# Altium PCB DEMO-BOARD.PcbDoc
Units mil, origin at the board's own origin, x right, y up, seen from the top; angles counter-clockwise.
Board outline 1995 x 1440 mil, 2 copper layers (Top Layer, Bottom Layer); 13 components, 12 nets, 55 pads, 7 vias.
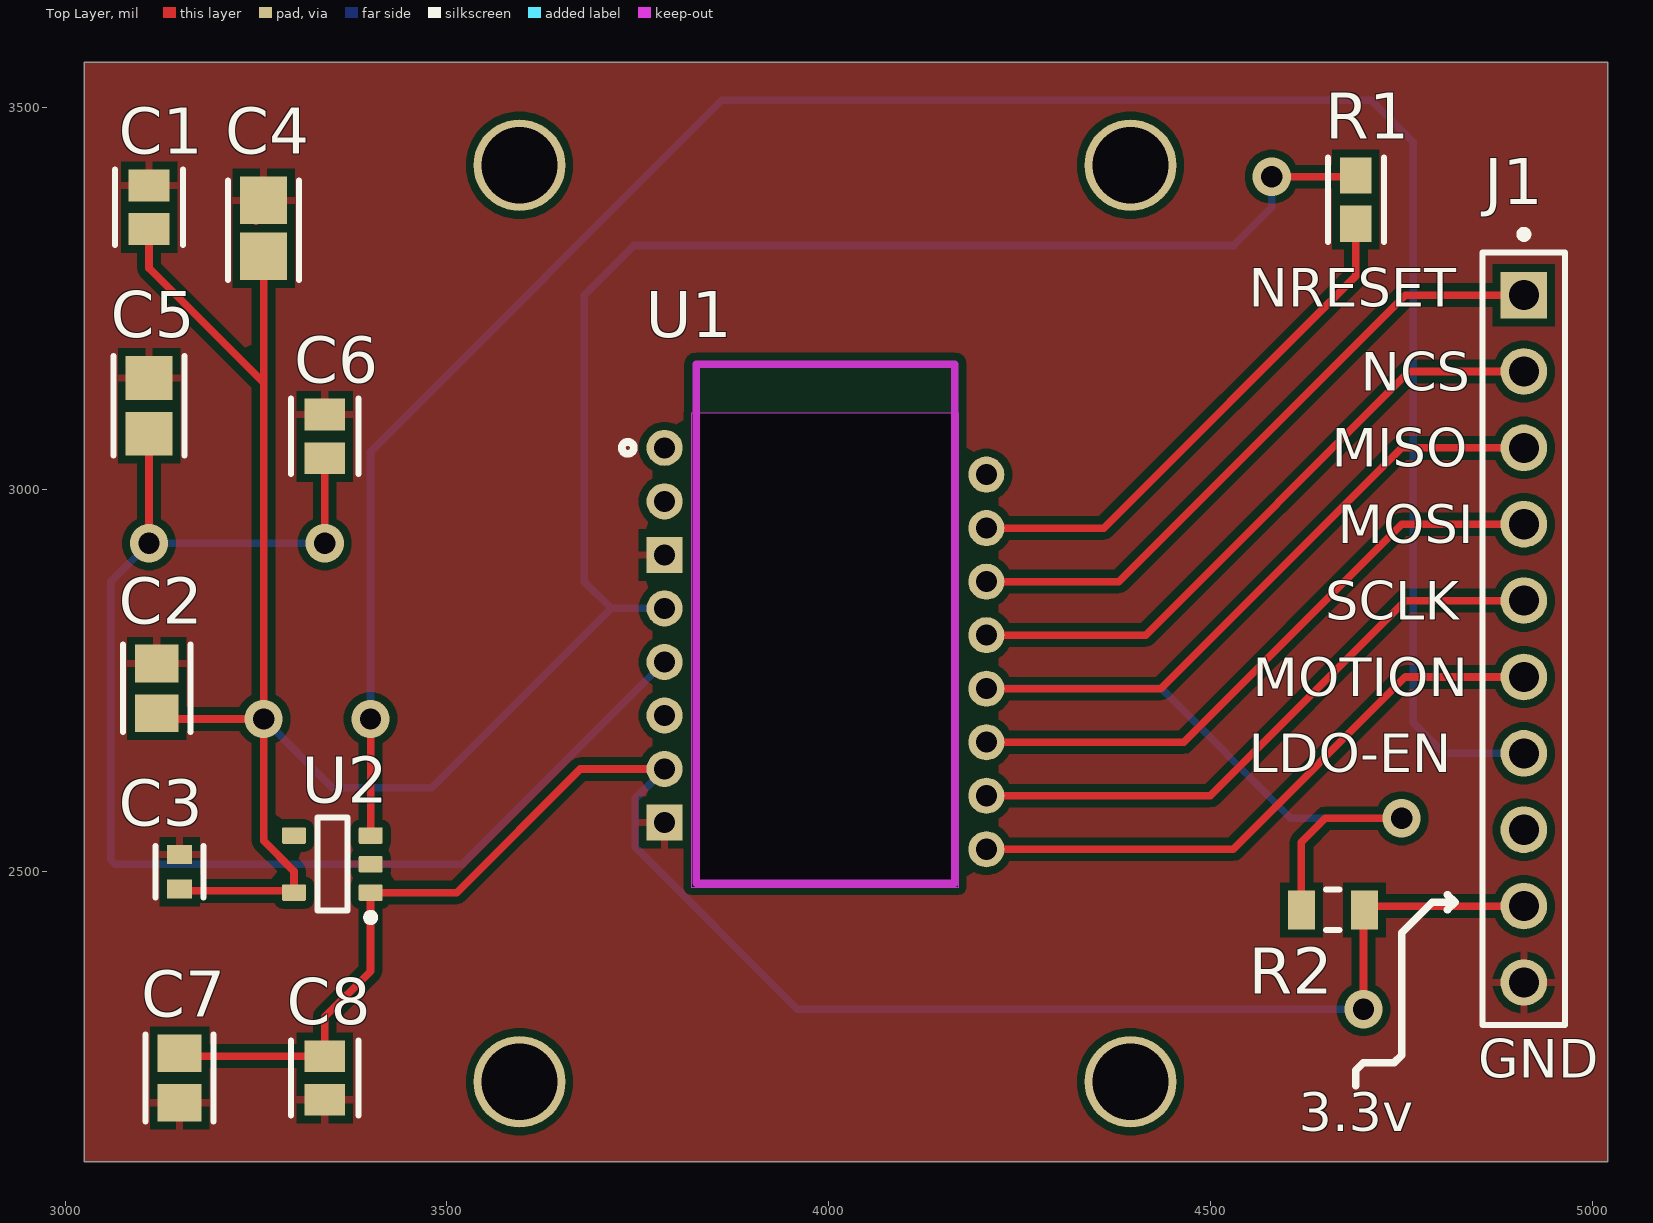
[diagram p0: Top Layer view]
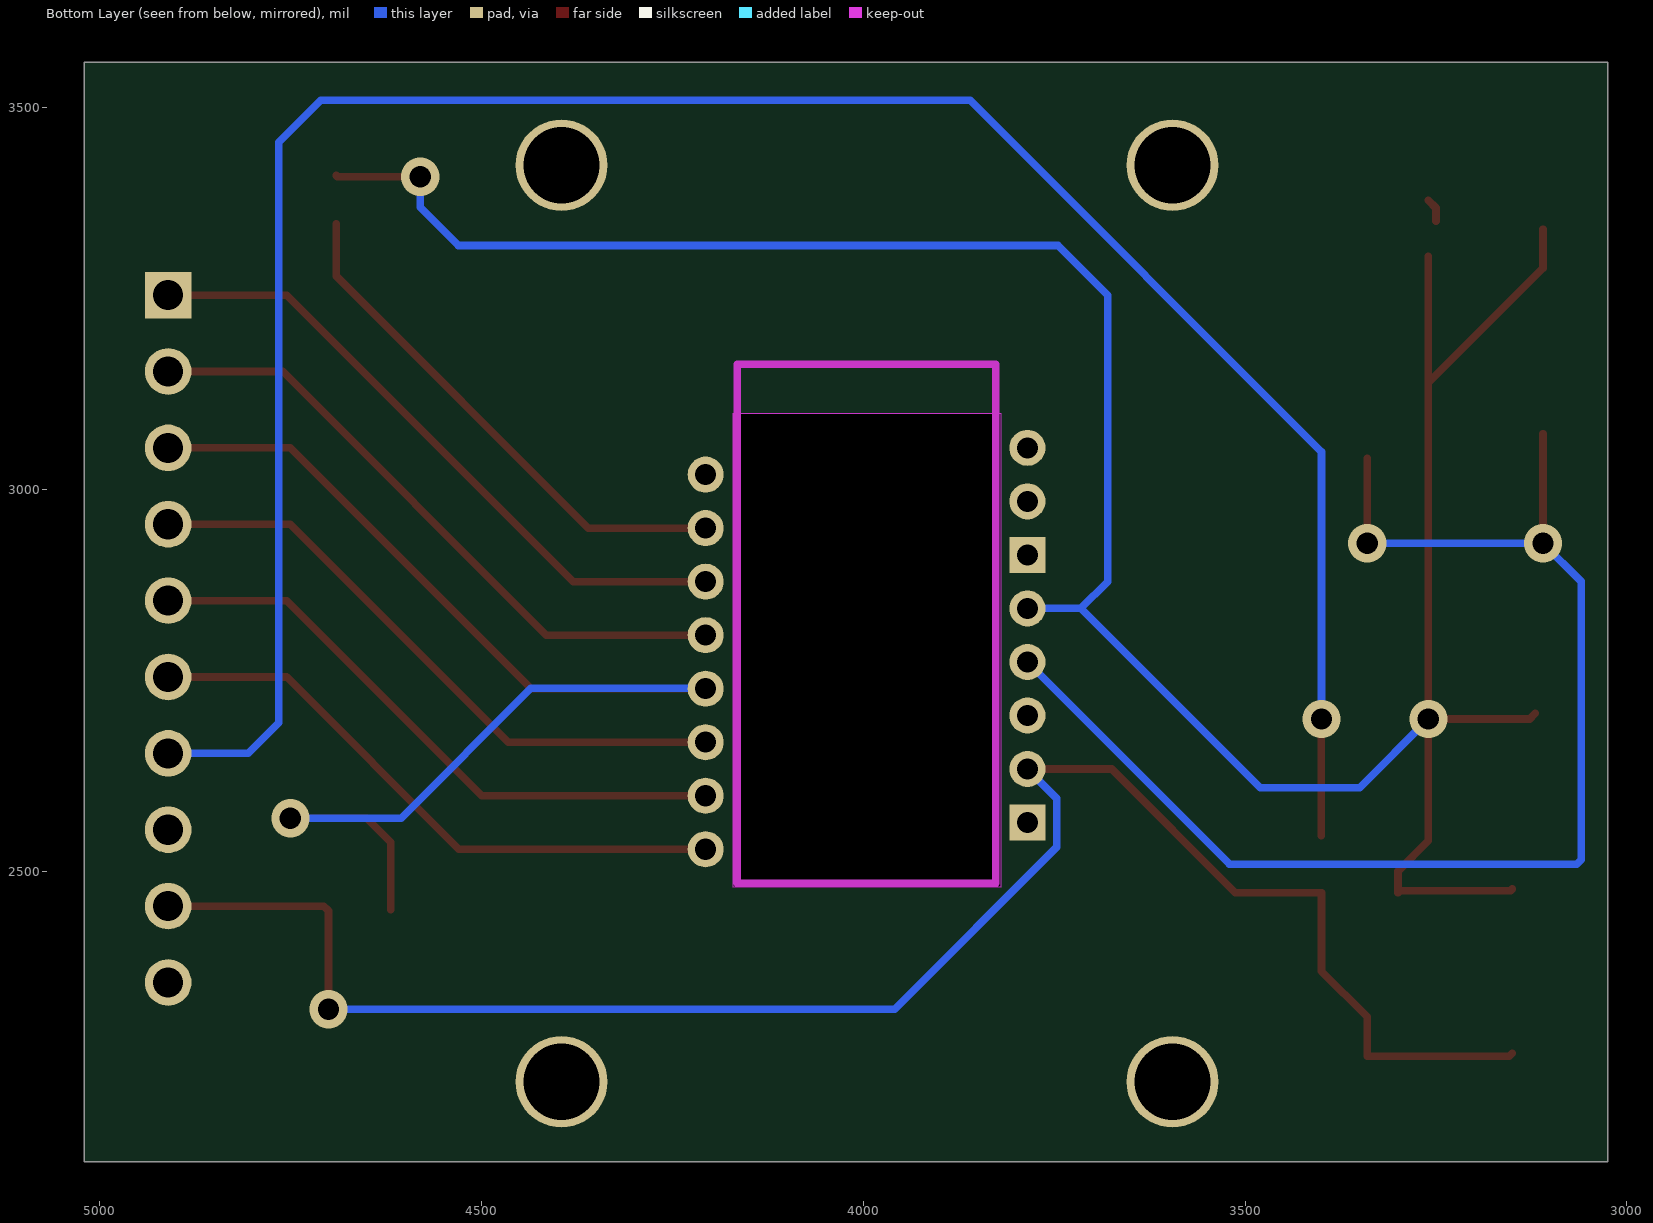
[diagram p1: Bottom Layer view, seen from below]
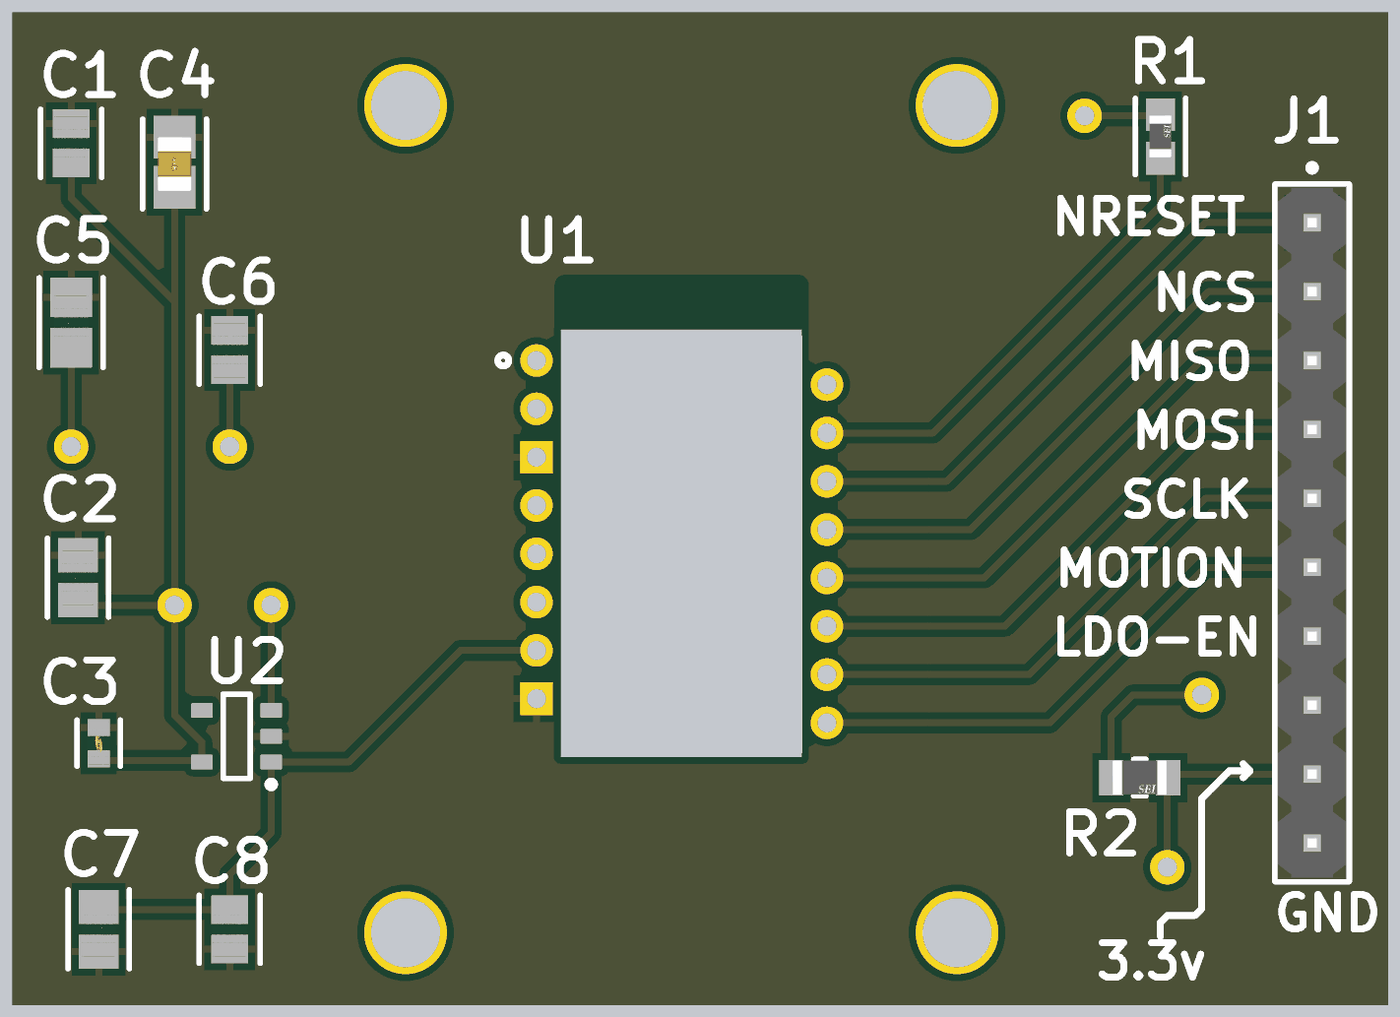
[diagram p2: 3D render of the assembled board from above, using the file's embedded part models]

## Layer stack, top to bottom
Top Solder: solder mask 0.4, Solder Resist, Dk 3.5
Top Layer: signal copper 1.4
Dielectric 1: dielectric 12.6, FR-4, Dk 4.8
Bottom Layer: signal copper 1.4
Bottom Solder: solder mask 0.4, Solder Resist, Dk 3.5

## Board outline
3025,2120 3025,3560 5020,3560 5020,2120
cut-out: 3820,2480 4170,2480 4170,3100 3820,3100

## Design rules (kind name [scope] priority, off if disabled: settings)
Clearance [All] p1: gap=10 ignorepadtopadclearanceinfootprint=FALSE
PolygonConnect [All] p1: connectstyle=Relief reliefconductorwidth=10 reliefentries=4 polygonreliefangle="90 Angle" airgapwidth=10
RoutingVias [All] p1: holewidth=28 width=50 viastyle="Through Hole" minholewidth=28 minwidth=50 maxholewidth=28 maxwidth=50
SolderMaskExpansion [All] p1: expansion=0 istentingtop=FALSE
SupplyNets "Schematic Supply Nets_2" [InNet('GND')] p1: voltage=0.000
SupplyNets "Schematic Supply Nets_1" [InNet('+3.3V')] p2: voltage=0.000
SupplyNets "Schematic Supply Nets" [InNet('+1.9V')] p3: voltage=0.000
Width [All] p1: maxlimit=10 minlimit=10 preferedwidth=10
30 further rules are at their usual default settings.

## Components (designator, comment, footprint, x,y, rotation, side; value= is the part's Value field where it differs from the comment)
C1 "100nF" FP-CL21-IPC_C 3110,3370 r90 top
C2 "10uF" FP-CL21-IPC_B 3120,2740 r90 top
C3 "1uF" FP-CL10B105KO8NNNC-MFG 3150,2500 r90 top
C4 "33uF" FP-C2012-125-0_2-IPC_A 3260,3340 r90 top
C5 "4.7uF" FP-CL21-IPC_A 3110,3110 r90 top
C6 "100nF" FP-CL21-IPC_C 3340,3070 r90 top
C7 "10uF" FP-CL21-IPC_B 3150,2230 r270 top
C8 "100nF" FP-CL21-IPC_C 3340,2230 r270 top
J1 "PREC010SAAN-RC" FP-PREC010SAAN-RC-MFG 4910,2805 r270 top
R1 "5.6" FP-RMCF0603-IPC_A 4690,3380 r90 top
R2 "10K" FP-RMCF0805-MFG 4660,2450 r0 top
U1 "PAW3395DM-T6QU" PAW3395DM-T6QU 3995,2810 r0 top
U2 "TLV70019DDCR" DDC0005A_L 3350,2510 r180 top

## Footprints (in the part's own frame and the unit in brackets; to place one, negate y for a bottom-side part, rotate by r counter-clockwise, add the part's x,y. Pads: shape width x height; smd on the part's side, far side on the other; paste and mask are expansions set on the pad)
DDC0005A_L [mm] "SOT23, 5-Leads, Body 3.05x1.75mm, Pitch 0.95mm, IPC High Density"
  rrect18% 0.8x0.55 smd: 1(-1.275,0.95) 2(-1.275,0) 3(-1.275,-0.95) 4(1.275,-0.95) 5(1.275,0.95)
  silkscreen extent -1.4,-1.55 0.5,1.9, body extent -0.88,-1.52 0.87,1.53, height 1.1
FP-C2012-125-0_2-IPC_A [mil]
  rect 62.13x61.27 smd paste+0 mask+0: 1(-34.02,0) 2(39.02,0)
  silkscreen extent -65,-46 65,46, body extent -85,-50 85,50, height 10
FP-CL10B105KO8NNNC-MFG [mm]
  rect 0.625x0.825 smd paste+0 mask+0: 1(-0.575,0) 2(0.575,0)
  silkscreen extent -0.85,-0.8 0.85,0.8, body extent -0.99,-0.55 0.99,0.55, height 0.25
FP-CL21-IPC_A [mil]
  rect 57.27x61.27 smd paste+0 mask+0: 1(-36.45,0) 2(36.45,0)
  silkscreen extent -65,-46 65,46, body extent -85,-50 85,50, height 10
FP-CL21-IPC_B [mil]
  rect 49.4x57.33 smd paste+0 mask+0: 1(-32.51,0) 2(32.51,0)
  silkscreen extent -57,-44 57,44, body extent -67,-39 67,39, height 10
FP-CL21-IPC_C [mil]
  rect 41.52x53.39 smd paste+0 mask+0: 1(-28.57,0) 2(28.57,0)
  silkscreen extent -49,-44 49,44, body extent -53,-32 53,32, height 10
FP-PREC010SAAN-RC-MFG [mm]
  rect 1.55x1.55 hole 1 paste-2539.97 mask+0: 1(-11.43,0)
  round 1.55 hole 1 paste-2539.97 mask+0: 2(-8.89,0) 3(-6.35,0) 4(-3.81,0) 5(-1.27,0) 6(1.27,0) 7(3.81,0) 8(6.35,0) 9(8.89,0) 10(11.43,0)
  silkscreen extent -13.57,-1.37 12.85,1.37, body extent -12.95,-1.47 12.95,1.47, height 0.25
FP-RMCF0603-IPC_A [mil]
  rect 47.48x41.66 smd paste+0 mask+0: 1(-31.54,0) 2(31.54,0)
  silkscreen extent -55,-37 55,37, body extent -75,-41 75,41, height 10
FP-RMCF0805-MFG [mm]
  rect 0.9x1.3 smd paste+0 mask+0: 1(-1.05,0) 2(1.05,0)
  silkscreen extent -0.23,-0.67 0.23,0.67, body extent -1.6,-0.77 1.6,0.77, height 0.25
PAW3395DM-T6QU [mm] "PixArt PAW3395DM-T6QU optical navigation sensor, 16-pin molded lead-frame DIP, 1.78mm pitch staggered dual row, 10.7mm row spacing, through-hole"
  round 1.2 hole 0.7: 1(-5.334,6.223) 2(-5.334,4.443) 4(-5.334,0.883) 5(-5.334,-0.897) 6(-5.334,-2.677) 7(-5.334,-4.457) 9(5.366,-7.127) 10(5.366,-5.347) 11(5.366,-3.567) 12(5.366,-1.787) 13(5.366,-0.007) 14(5.366,1.773) 15(5.366,3.553) 16(5.366,5.333)
  rect 1.2x1.2 hole 0.7: 3(-5.334,2.663) 8(-5.334,-6.237)
  Keep-Out Layer lines w0.254: -4.284,-8.257 -4.284,9.003 4.316,9.003 4.316,-8.257 -4.284,-8.257
  silkscreen extent -6.76,6.02 -6.36,6.42

## Part data
C1 C6 C8: library part CMP-2000-05017-2, "CL21 Series 0805 100nF 50V ±10% Tolerance X7R Multilayer Ceramic Chip Capacitor", Case Code (Imperial)=0805, Case Code (Metric)=2012, Dielectric=X7R, Max Operating Temperature=125°C, Min Operating Temperature=-55°C, Tolerance=10%, Voltage=50V, Capacitance=100nF, Case/Package=0805, Contact Plating=Tin, Depth=1.25mm, Height=0.85mm, Lead Free="Lead Free", Length=2mm, Material=Ceramic, Mount="Surface Mount", Packaging="Tape and Reel", Radiation Hardening=No, Thickness=0.037inch, Voltage Rating=50V, Voltage Rating (DC)=50V, Width=0.049inch
C2 C7: library part CMP-13271-001796-1, "CL21 Series 0805 10uF 10V ±10% Tolerance X5R Multilayer Ceramic Chip Capacitor", Case Code (Imperial)=0805, Case Code (Metric)=2012, Dielectric=X5R, Max Operating Temperature=85°C, Min Operating Temperature=-55°C, Package Quantity=3000, Tolerance=10%, Voltage=10V, Capacitance=10uF, Case/Package=0805, Depth=1.25mm, Height=1.25mm, Lead Free="Lead Free", Length=2mm, Mount="Surface Mount", Packaging="Tape and Reel", Radiation Hardening=No, Termination=Wraparound, Thickness=0.053inch, Voltage Rating=10V, Width=0.049inch
C3: library part CMP-2000-06093-2, "CAP CER 1UF 16V X7R 0603", Manufacturer="Samsung Electro-Mechanics America, Inc", Manufacturer Part Number=CL10B105KO8NNNC, Temperature="-55°C to +125°C", Temperature Characteristic=X7R, Temperature Coefficient=15%, Temperature Range High=+125°C, Temperature Range Low=-55°C, Tolerance=10%, Voltage Rating=16V, Automotive=No, Capacitance=1uF, Category=Cap, ComponentLink2Description=Datasheet, ComponentLink2URL=http://www.samsungsem.com/global/front/downloadcms.do?path=%2F%2Fglobal%2F%2Fsupport%2F%2Fproduct-search%2F%2Fmlcc%2F%2F__icsFiles%2F%2Fafieldfile%2F%2F2019%2F%2F06%2F%2F18&fileName=CL10B105KO8NNNC-19.pdf, Device Class L1="Passive Components", Device Class L2=Capacitors, Device Class L3="Ceramic Capacitors", Digikey Description="CAP CER 1UF 16V X7R 0603", Height=0.9mm, Ipc Land Pattern Name=CAPC16080X80, Lead Free=Yes, Material=Ceramic, Octopart=https://octopart.com/cl10b105ko8nnnc-samsung-19018973, Package=CL10B105KO8NNNC, RoHS=TRUE
C4: library part CMP-08246-003796-1, "Multilayer Ceramic Capacitors 33μF ±20% 6.3V X5R SMD 0805", Case Code (Imperial)=0805, Case Code (Metric)=2012, Dielectric=X5R, Dielectric Material=Ceramic, Max Operating Temperature=85°C, Min Operating Temperature=-55°C, Package Quantity=1, Tolerance=20%, Voltage Rating=6.3V, Capacitance=33uF, Case/Package=0805, Construction=Flat, Depth=1.25mm, Height=1.25mm, Lead Free="Lead Free", Length=2mm, Mount="Surface Mount", Packaging="Tape and Reel", Radiation Hardening=No, REACH SVHC="No SVHC", Resistor Type=Ceramic, RoHS Compliant=Yes, Series=C, Termination=SMD/SMT, Thickness=0.057inch, Voltage Rating (DC)=6.3V, Weight=0.000194oz, Width=1.2mm
C5: library part CMP-13271-002624-1, "CL21 Series 0805 4.7uF 25V ±10% Tolerance X5R Multilayer Ceramic Chip Capacitor", Case Code (Imperial)=0805, Case Code (Metric)=2012, Dielectric=X5R, Max Operating Temperature=85°C, Min Operating Temperature=-55°C, Package Quantity=1, Tolerance=10%, Voltage Rating=25V, Capacitance=4.7uF, Case/Package=0805, Depth=1.25mm, Height=1.25mm, Lead Free="Lead Free", Length=2mm, Mount="Surface Mount", Packaging="Tape and Reel", Radiation Hardening=No, Thickness=0.055inch, Voltage Rating (DC)=25V, Width=0.049inch
J1: library part CMP-25680-000020-1, "CONN HEADER VERT 10POS 2.54MM", Current Rating=3A, Manufacturer=Sullins, Temperature="-40°C to +105°C", Temperature Range High=+105°C, Temperature Range Low=-40°C, Automotive=No, Category=Conn, ComponentLink2Description=Datasheet, ComponentLink2URL=https://drawings-pdf.s3.amazonaws.com/11635.pdf, Conn Gender=Male, Conn Orientation=Straight, Contact Material=Tin,Nickel, Device Class L1=Connectors, Device Class L2="Headers and Wire Housings", Device Class L3=unset, Digikey Description="CONN HEADER VERT 10POS 2.54MM", Height=8.74mm, Lead Free=Yes, Manufacturer Part Number=PREC010SAAN-RC, Number Of Contacts=10, Number Of Rows=1, Octopart=https://octopart.com/prec010saan-rc-sullins-22265171, Package=PREC010SAAN-RC, Pitch=2.54mm, RoHS=TRUE
R1: library part CMP-26527-007122-1, "5.6Ω ±1% 0.1W 0603 Thick Film Chip Resistor AEC-Q200 compliant", Case Code (Imperial)=0603, Case Code (Metric)=1608, Max Operating Temperature=155°C, Max Power Dissipation=100mW, Min Operating Temperature=-55°C, Resistance=5.6R, Resistor Type="Thick Film", Temperature Coefficient=200ppm/°C, Tolerance=1%, Case/Package=0603, Contact Plating=Tin, Features="Automotive AEC-Q200", Height=0.022inch, Length=0.061inch, Mount="Surface Mount", Number of Terminations=2, Packaging="Tape and Reel", Radiation Hardening=No, RoHS Compliant=Yes, Series=RMCF, Width=0.031inch
R2: library part CMP-26527-000121-1, "RES 10K OHM 1% 1/8W 0805", Case Code (Imperial)=0805, Case Code (Metric)=2012, Max Operating Temperature=155°C, Max Power Dissipation=125mW, Min Operating Temperature=-55°C, Resistance=10kR, Resistor Type="Thick Film", Temperature Coefficient=100ppm/°C, Tolerance=1%, Case/Package=0805, Construction=Rectangular, Contact Plating=Tin, Depth=1.25mm, Features="Automotive AEC-Q200", Height=0.026inch, Lead Free="Lead Free", Length=2mm, Military Standard=Not, Mount="Surface Mount", Number of Terminations=2, Packaging="Tape and Reel", Power Rating=125mW, Radiation Hardening=No, RoHS Compliant=Yes, Series=RMCF, Size Code=0805, Width=0.049inch
U1: "PixArt PAW3395DM-T6QU optical navigation sensor, 16-pin molded lead-frame DIP, 1.78mm pitch staggered dual row, 10.7mm row spacing, through-hole"
U2: library part CMP-0394-01054-2, "Single Output LDO, 200 mA, Fixed 1.9 V Output, 2 to 5.5 V Input, with Low IQ, 5-pin SOT (DDC), -40 to 125 degC, Green (RoHS & no Sb/Br)", Manufacturer="Texas Instruments", Accuracy(%)=2, Code_JEDEC=MO-193, ComponentLink1Description="Manufacturer URL", ComponentLink1URL=http://www.ti.com/, ComponentLink2Description=Datasheet, ComponentLink2URL=http://www.ti.com/general/docs/lit/getliterature.tsp?genericPartNumber=TLV70019&fileType=pdf, ComponentLink3Description="Package Specification", ComponentLink3URL=http://www.ti.com/litv/pdf/mpds123d, DatasheetVersion=SLVSA00D, Eco-Plan="Green (RoHS & no Sb/Br)", Fixed Output Options(V)=1.9, Iout(Max)(A)=0.2, Iq(Typ)(mA)=0.03, Mounting Technology="Surface Mount", PackageDescription="5-Pin Plastic Small Outline, Body 2.9 x 1.6 mm, 0.95 mm Pitch", PackageReference=DDC0005A, PackageVersion=4204403-2/E, PartNumber=TLV70019DDCR, SubFamily="Single Channel LDO", Vdo(Typ)(mV)=175, Vin(Max)(V)=5.5, Vin(Min)(V)=2, Vout Adj(Max)(V)=1.9, Vout Adj(Min)(V)=1.9

## Free pads (board coordinates)
  round 120 hole 100: 1(3595,3425) 2(4395,3425) 5(3595,2225) 6(4395,2225)

## Via types
v1: diameter 50, hole 28, Top Layer to Bottom Layer, 7 vias

## Nets (pads, with @x,y where several pads share a name; then routed paths per layer and width w, separated by ;. In a path a pad name is that pad's centre, name@x,y a point inside that pad or via, vN(x,y) a via of type N, cw(c..) or ccw(c..) an arc to the next point about the centre after c; other vN are vias at no path point)
+1.9V: C1.1 C2.1 C3.1 C4.1 R1.2 U1.4 U2.5 | length 3590.8
  Top Layer w10: C1.1 3110,3290 3260,3140 ; C2.1 3127.49,2700 v1(3260,2700) ; C3.1 3152.38,2474.98 3297.42,2474.98 U2.5 3299.8,2500.76 3260,2540.56 v1(3260,2700) ; C4.1 3260,3140 ; v1(4580,3410) 4688.46,3410 R1.2 ; v1(3260,2700) 3260,3140
  Bottom Layer w10: v1(3260,2700) 3350,2610 3480.24,2610 3715,2844.76 ; U1.4 3715,2844.76 ; v1(4580,3410) 4580,3370 4530,3320 3745,3320 3680,3255 3680,2879.76 3715,2844.76
+3.3V: C7.1 C8.1 J1.9 R2.2 U1.7 U2.1 | length 2383.5
  Top Layer w10: C7.1 3153.94,2258.57 C8.1 3340,2310 3400,2370 3400,2472.4 U2.1 3512.6,2472.6 3674.53,2634.53 U1.7 ; v1(4700,2320) 4700,2448.66 R2.2 4706.34,2455 J1.9
  Bottom Layer w10: U1.7 3746.38,2595.91 3746.38,2532.41 3958.79,2320 v1(4700,2320)
GND: C1.2 C2.2 C3.2 C4.2 C5.2 C6.2 C7.2 C8.2 J1.10 U1.3 U1.8 U2.2 | length 38.7
  Top Layer w10: C4.2@3250,3352.05 3250,3369.02 C4.2 ; U1.3@3780.16,2910 U1.3 ; U1.8@3784.45,2565 U1.8
NetC5_1: C5.1 C6.1 U1.5 | length 1756.9
  Top Layer w10: v1(3110,2930) C5.1 ; v1(3340,2930) C6.1
  Bottom Layer w10: v1(3340,2930) v1(3110,2930) 3060,2880 3060,2515.86 3065.86,2510 3520.32,2510 U1.5
NetJ1_1: J1.1 U1.14 | length 859.2
  Top Layer w10: U1.14 4379.8,2879.8 4755,3255 J1.1
NetJ1_2: J1.2 U1.13 | length 846.8
  Top Layer w10: U1.13 4414.72,2809.72 4760,3155 J1.2
NetJ1_3: J1.3 R2.1 U1.12 | length 1681.6
  Top Layer w10: U1.12 4434.65,2739.65 4750,3055 J1.3 ; R2.1 4618.66,2538.66 4650,2570 v1(4750,2570)
  Bottom Layer w10: U1.12 4206.61,2740 4435,2740 4605,2570 v1(4750,2570)
NetJ1_4: J1.4 U1.11 | length 822
  Top Layer w10: U1.11 4464.57,2669.57 4750,2955 J1.4
NetJ1_5: J1.5 U1.10 | length 809.6
  Top Layer w10: U1.10 4499.49,2599.49 4755,2855 J1.5
NetJ1_6: J1.6 U1.9 | length 797.2
  Top Layer w10: U1.9 4529.41,2529.41 4755,2755 J1.6
NetJ1_7: J1.7 U2.3 | length 3002.6
  Top Layer w10: v1(3400,2700) 3400.1,2699.9 3400.1,2547.5 U2.3
  Bottom Layer w10: v1(3400,2700) 3400,3050 3860,3510 4710,3510 4765,3455 4765,2695 4805,2655 J1.7
NetR1_1: R1.1 U1.15 | length 688.9
  Top Layer w10: U1.15 4359.88,2949.88 4690,3280 R1.1
pads on no net: J1.8 U1.1 U1.2 U1.6 U1.16 U2.4

## Polygon pours and split planes (outlines as drawn)
GND on Top Layer "GND_L01_P002" (solid, remove dead copper, pour order 2): 3025,3560 5020,3560 5020,2120 3025,2120

## Silkscreen, mask and mechanical layers (free items; w line width, h text height)
Top Overlay:
  lines w10: 4690,2220 4690,2240 4700,2250 4740,2250 4750,2260 4750,2420 4790,2460 4810,2460 4820,2460 ; 4810,2450 4820,2460 ; 4810,2470 4820,2460
  text "NRESET" at 4550,3240 h50
  text "NCS" at 4696.71,3130 h50
  text "MISO" at 4658.3,3030 h50
  text "MOSI" at 4666.63,2930 h50
  text "SCLK" at 4649.97,2830 h50
  text "MOTION" at 4555.09,2730 h50
  text "LDO-EN" at 4550,2630 h50
  text "GND" at 4850,2230 h50
  text "3.3v" at 4615.06,2160 h50
Mechanical 1:
  the board outline again, w10